# Altium PCB PROC106B_ASCII.PcbDoc (part 4 of 8)
Units mil, origin at the board's own origin, x right, y up, seen from the top; angles counter-clockwise.
Board outline 4498.18 x 1060.53 mil, 8 copper layers (Top Layer, GND1, Sig1, PWR1, PWR2, Sig2, GND2, Bottom Layer), stack 69.602 mil thick; 439 components, 327 nets, 1548 pads, 843 vias.
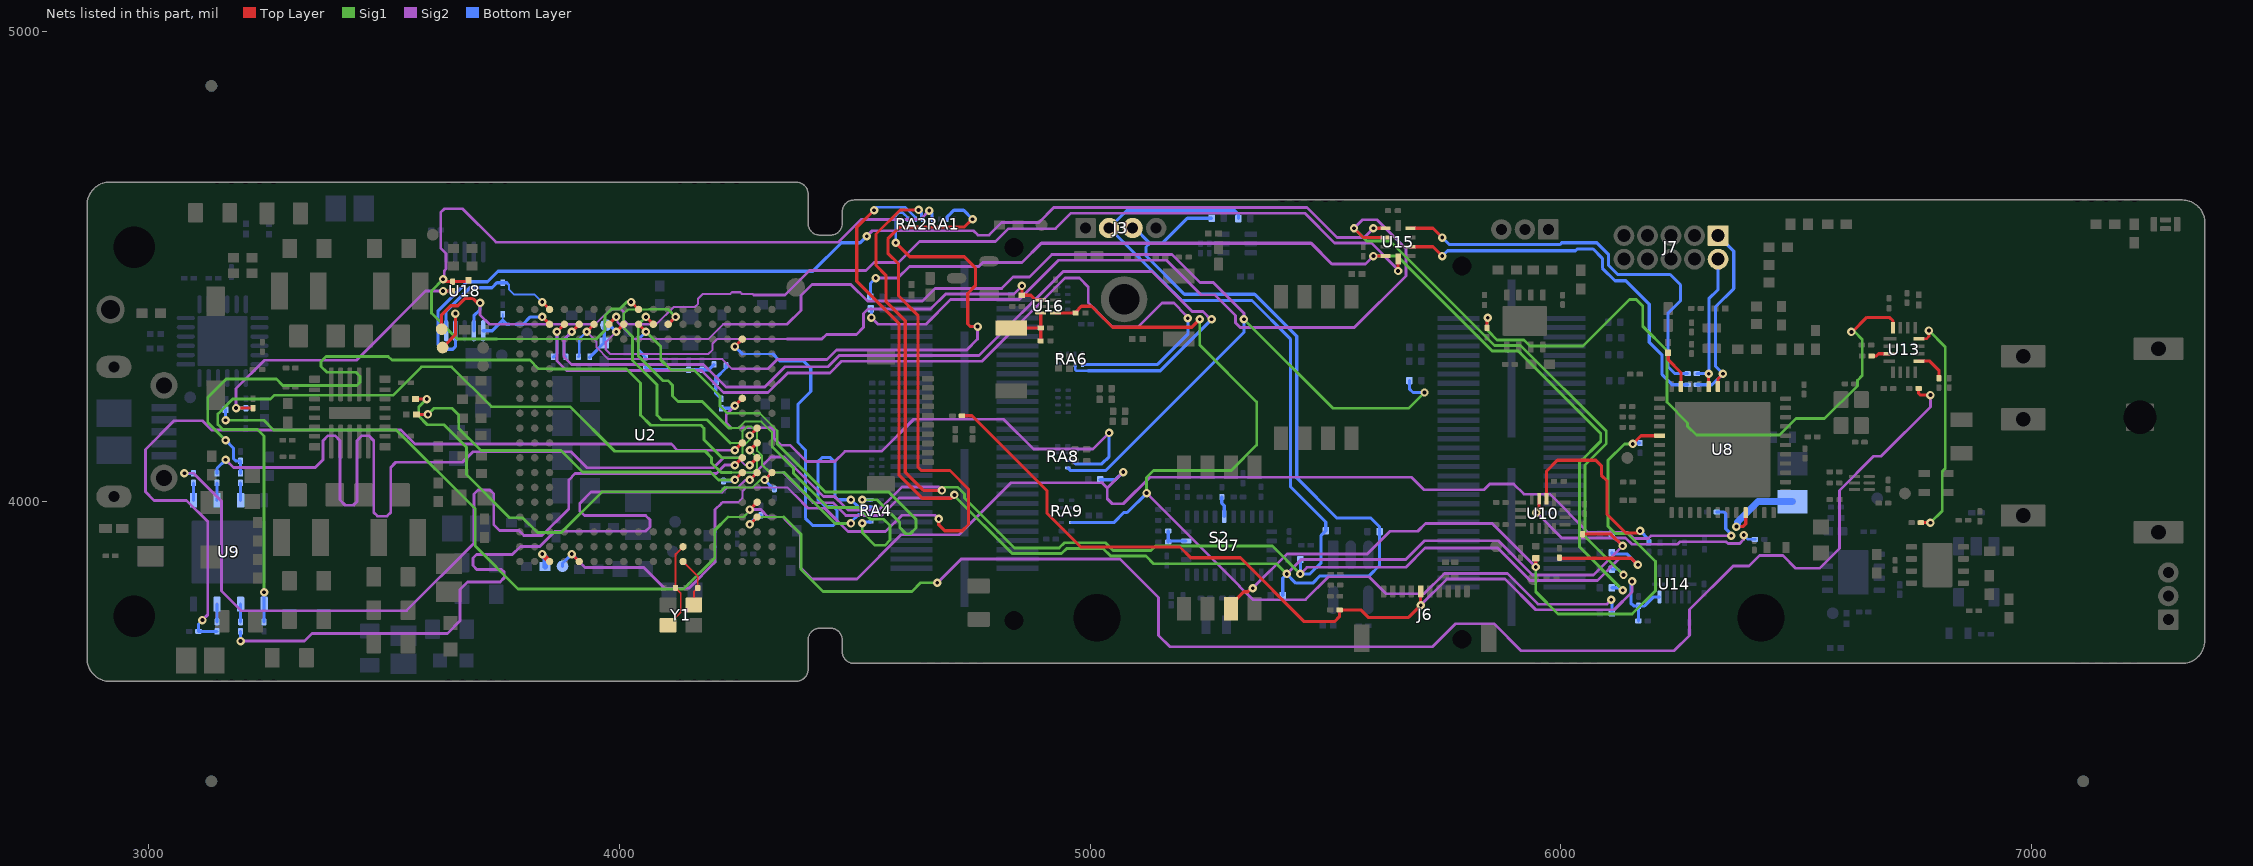
[diagram p10: the nets of this part, all layers, seen from the top]

## Via types
v1: diameter 18, hole 8, Top Layer to Bottom Layer, tented both sides, 804 vias
v2: diameter 19.68, hole 7.87, Top Layer to Bottom Layer, tented both sides, 34 vias
v3: diameter 20, hole 10, Top Layer to Bottom Layer, tented both sides, 3 vias
v4: diameter 18, hole 8, Top Layer to Bottom Layer, 1 vias
v5: diameter 17, hole 7.87, Top Layer to Bottom Layer, 1 vias

## Nets (pads, with @x,y where several pads share a name; then routed paths per layer and width w, separated by ;. In a path a pad name is that pad's centre, name@x,y a point inside that pad or via, vN(x,y) a via of type N, cw(c..) or ccw(c..) an arc to the next point about the centre after c; other vN are vias at no path point) (continued)
AR_MSS_LOGGER: R58.1 R61.1 R131.1 U2.E2 | length 4027.5
  Top Layer w6.7: v1(4276.95,3983.65) U2.E2@4292.7,3999.4
  Sig1 w4.5: 4230.89,3967.9 4263.85,3967.9 v1@4276.95,3981.01
  Sig1 w5.95: v1(3163.55,4173.41) 3244.94,4173.41 3265.5,4152.85 3526.01,4152.85 3694.1,3984.76 3694.1,3905.76 3784.97,3814.9 4136.48,3814.9 4202.76,3881.17 4202.76,3939.76 4230.89,3967.9 ; v1@4276.95,3981.01 v1(4276.95,3983.65)
  Sig2 w4.5: 4332.4,3967.9 4347.49,3967.9 4351.37,3964.02
  Sig2 w5.95: v1(4276.95,3983.65) 4300.25,3983.65 4316,3967.9 4332.4,3967.9 ; 4351.37,3964.02 4384.8,3930.59 4384.8,3860.7 4409.3,3836.2 4504.48,3836.2 4598.64,3930.36 4721.32,3930.36 4831.75,4040.79 5024.98,4040.79 5036.27,4029.5 ; v1(5070.29,4063.51) 5036.27,4029.5 ; v1(6361.81,3928) 6191.21,3928 6185.35,3922.14 6155.37,3922.14 6142.32,3935.19 6057.76,3935.19 5976.45,4016.5 5921.24,4016.5 5899.64,4038.09 5848.9,4038.09 5836.7,4025.89 5709.49,4025.89 5682.87,4052.51 5126.86,4052.51 5070.48,3996.13 5046.92,3996.13 5036.27,4006.77 5036.27,4029.5
  Bottom Layer w6.7: v1(3163.55,4173.41) R61.1@3163.55,4195.73 ; R131.1@6331.18,3978.41 6346.63,3978.41 6350.14,3974.9 6350.14,3942.93 6361.81,3931.25 v1(6361.81,3928)
  Bottom Layer w7: R58.1@5021.79,4046.94 5053.71,4046.94 v1(5070.29,4063.51)
AR_NERR_OUT: R21.1 RA6.5 U2.U15 | length 1993.9
  Top Layer w6.7: v1(3867.5,4361.6) U2.U15@3883.25,4377.35
  Sig2 w5.95: v1(3867.5,4361.6) 3867.5,4299.23 3887.45,4279.28 4174.81,4279.28 4221.6,4232.49 4315.95,4232.49 4357.63,4274.16 4447.2,4274.16 4471.92,4298.87 4770.04,4298.87 4946.76,4475.6 4977.21,4475.6 4995.86,4456.94 4995.86,4423.5 5012.97,4406.38 5012.97,4405.96 5047.64,4371.29 5101.75,4371.29 5152.98,4422.52 5177.86,4422.52 5202.97,4397.42 5202.97,4394.51 v1(5207.55,4389.93)
  Bottom Layer w5.95: R21.1@3859.46,4307.45 3867.5,4315.49 v1(3867.5,4361.6)
  Bottom Layer w6.7: RA6.5@4983.83,4292.08 5143.25,4292.08 5207.55,4356.38 v1(5207.55,4389.93)
AR_NERRIN: R22.1 RA6.6 U2.U14 | length 2037.8
  Top Layer w6.7: v1(3899,4361.6) U2.U14@3914.75,4377.35
  Sig2 w5.95: v1(3899,4361.6) 3882.53,4345.13 3882.53,4307.96 3898.41,4292.07 4178.83,4292.07 4226.53,4244.38 4308.8,4244.38 4351.48,4287.06 4443.29,4287.06 4466.99,4310.77 4763.99,4310.77 4942.88,4489.66 5131.64,4489.66 5216.95,4404.35 5239.74,4404.35 5256.22,4387.88 v1(5258,4387.88)
  Bottom Layer w5: RA6.6@4968.09,4292.08 4968.09,4281.08 4970.49,4278.67 4995.62,4278.67
  Bottom Layer w5.95: R22.1@3886.6,4307.94 R22.1@3886.73,4307.81
  Bottom Layer w6.7: R22.1@3886.73,4308.06 3882.45,4312.34 3882.45,4345.05 v1(3899,4361.6) ; 4995.62,4278.67 5148.79,4278.67 v1(5258,4387.88)
AR_NRST: C130.2 R59.1 R108.1 TP14.1 U2.U11 U16.4 | length 1215.9
  Top Layer w6.7: v1(3993.49,4361.6) U2.U11@4009.24,4377.35 ; v1(4855.01,4458.72) R108.1@4855.01,4439.06 4873.81,4439.06 4883.54,4429.33 U16.4@4894.79,4429.33
  Sig2 w4.5: v1(3993.49,4361.6) 3971.08,4339.19 3971.08,4323.63 3980.36,4314.36 4188.99,4314.36 4198.21,4323.58 4198.21,4336.63 4207.44,4345.85 4210.57,4345.85 4355.81,4345.85
  Sig2 w5.95: 4355.81,4345.85 4429.85,4345.85 4439.71,4355.71 4503.49,4355.71 4518.87,4371.09 4518.87,4400.52 4527.91,4409.56 4661.14,4409.56 4693.34,4441.76 4838.05,4441.76 v1(4855.01,4458.72)
  Bottom Layer w6.7: R59.1@3936.98,4307.45 3967.27,4337.73 C130.2@3967.83,4337.73 3967.83,4371.87 TP14.1@3971.52,4375.57 3979.52,4375.57 v1(3993.49,4361.6)
AR_NRST_1: R177.2 R190.2 RA9.8 U16.1 | length 2330.8
  Top Layer w6.7: U16.1@4926.29,4401.5 R177.2@4969.1,4401.5 4969.1,4403.14 4981.52,4415.55 5002.84,4415.55 5047.49,4370.91 5215.8,4370.91 5232.92,4388.03 v1(5232.92,4387.88)
  Sig1 w5.95: v1(5119.9,4018.83) 5119.9,4051.66 5134.96,4066.71 5299.7,4066.71 5353.73,4120.75 5353.73,4212.26 5232.92,4333.07 v1(5232.92,4387.88)
  Sig2 w5.95: v1(5119.9,4018.83) 5307.53,3831.21 5307.83,3831.21 5317.48,3821.56 5317.48,3820.44 5345.54,3792.38 5457.74,3792.38 5506.4,3841.04 5592.06,3841.04 5628.22,3804.88 5709.46,3804.88 5752.57,3847.99 5886.36,3847.99 5951.51,3782.84 6097.61,3782.84 v1(6107.15,3792.38)
  Bottom Layer w6.7: RA9.8@4960.68,3956.14 5050.1,3956.14 5071.56,3977.6 5078.67,3977.6 v1(5119.9,4018.83) ; v1(6107.15,3792.38) 6108.34,3791.19 R190.2@6108.34,3764.53
AR_NRST_2: C120.1 R124.1 SW2.1 U16.6 | length 121.5
  Top Layer w6.7: SW2.1@4832.84,4369.7 C120.1@4895.16,4369.7 ; R124.1@4894.79,4342.12 4895.16,4342.49 C120.1@4895.16,4369.7 ; U16.6@4895.16,4401.13 C120.1@4895.16,4369.7
AR_OSC_CLKOUT: RA1.3 TP17.1 U2.A14 | length 2160
  Top Layer w6.7: v1(3899,3889.16) U2.A14@3914.75,3873.41 ; v1(4678.32,3963.9) 4678.32,3951.47 4691.07,3938.71 4728.27,3938.71 4741.71,3952.15 4741.71,4027.32 4702.22,4066.81 4641.35,4066.81 4634,4074.16 4634,4396.53 4592.89,4437.64 4592.89,4505.8 4570.34,4528.35 4570.34,4558.71 4570.48,4558.71 4595.75,4583.98 4732.62,4583.98 4749.22,4600.58 v1(4750.21,4600.58)
  Sig2 w4.5: 4216.61,3996.99 4219.01,3999.4 4252.38,3999.4 4260.74,4007.75 4260.74,4008.15 4261.2,4008.62 4261.2,4022.2 4269.9,4030.89 4356.68,4030.89 4374.22,4013.35
  Sig2 w5.95: v1(3899,3889.16) 3927.14,3861.02 4051.83,3861.02 4096.42,3816.43 4147.32,3816.43 4203.16,3872.28 4203.16,3983.55 4216.61,3996.99 ; 4374.22,4013.35 4401.08,3986.49 4436.31,3986.49 4485.8,3937 4565.31,3937 4600.06,3971.75 4670.46,3971.75 v1(4678.32,3963.9)
  Bottom Layer w6.7: TP17.1@3879.25,3863.39 3879.25,3869.41 v1(3899,3889.16) ; RA1.3@4695.96,4600.58 RA1.3@4695.96,4604.84 ; 4699.83,4609.28 4695.96,4605.41 RA1.3@4695.96,4604.84 ; v1(4750.21,4600.58) 4731.24,4619.54 4710.67,4619.54 RA1.3@4695.96,4604.84
AR_PMIC_CLKOUT_SOP2: R85.1 R103.1 RA1.1 U2.V10 | length 1923.4
  Top Layer w6.7: v1@3627.89,4468 R85.1@3645.85,4468 3676.79,4468 R103.1@3679.35,4470.56 ; v1(4024.98,4424.59) U2.V10@4040.73,4408.84
  Sig1 w4.5: 3740,4346 3740.15,4345.85 3950.85,4345.85
  Sig1 w5.95: v1(3625.63,4473) 3600.7,4448.07 3600.7,4400.98 3655.67,4346 3740,4346 ; 3950.85,4345.85 3969.75,4364.75 3969.75,4395.82 3983.5,4409.57 4000.77,4409.57 4015.79,4424.59 v1(4024.98,4424.59)
  Sig2 w5.95: v1(3625.63,4473) 3627.94,4475.31 3627.94,4490.7 3631.71,4494.48 3631.71,4527.96 3620.45,4539.22 3620.45,4614.92 3628.33,4622.8 3666.82,4622.8 3737.83,4551.8 4465.19,4551.8 4513.33,4599.94 4639.35,4599.94 v1(4658.32,4618.91)
  Bottom Layer w6.7: v1(4658.32,4618.91) 4664.47,4612.77 RA1.1@4664.47,4600.58
AR_QSPI_CLK: R47.1 U2.H2 | length 1804.7
  Top Layer w6.7: v1(4276.95,4078.14) U2.H2@4292.7,4093.88
  Sig2 w4.5: 4221.56,4093.88 4251.98,4093.88 4267.73,4078.14 4274.39,4078.14 v1(4276.95,4078.14)
  Sig2 w5.95: v1(3163.55,4089.57) 3180.08,4073.05 3354.04,4073.05 3370.54,4089.54 3370.54,4129.94 3381.32,4140.73 3395.7,4140.73 3406.48,4129.94 3406.48,4004.24 3417.86,3992.86 3434.79,3992.86 3442.43,4000.51 3442.43,4129.94 3453.21,4140.73 3467.59,4140.73 3478.38,4129.94 3478.38,3977.88 3486.54,3969.72 3506.26,3969.72 3514.32,3977.78 3514.32,4034.94 3514.32,4073.37 3525.11,4084.16 3527.46,4084.16 3667.04,4084.16 3689.38,4106.5 3897.64,4106.5 3931.46,4072.68 4200.36,4072.68 4221.56,4093.88
  Bottom Layer w6.7: R47.1@3145.35,4060.46 3145.35,4071.36 v1(3163.55,4089.57)
AR_QSPI_CLK_T: R47.2 U9.6 | length 36.9
  Bottom Layer w6.7: U9.6@3145.35,4003.53 R47.2@3145.35,4040.44
AR_QSPI_CS: R43.1 U2.J2 U9.1 | length 1881.9
  Top Layer w6.7: v1(4276.95,4109.63) U2.J2@4292.7,4125.38
  Sig1 w4.5: 4238.93,4062.39 4283.48,4062.39 4292.7,4071.61 4292.7,4093.88 v1(4276.95,4109.63)
  Sig1 w5.95: v1(3245.35,3808.14) 3245.35,4139.83 3231.35,4153.82 3157.65,4153.82 3147.08,4164.39 3147.08,4186.72 3178.84,4218.48 3258.83,4218.48 3266.76,4226.42 3519.43,4226.42 3579.96,4286.95 3643.5,4286.95 3728.11,4202.33 3895.54,4202.33 3990.27,4107.6 4182.33,4107.6 4195.99,4093.95 4195.99,4082.82 4216.42,4062.39 4237.91,4062.39
  Bottom Layer w6.7: R43.1@3245.35,3744.96 U9.1@3245.35,3783.06 v1(3245.35,3808.14)
AR_QSPI_D0: R6.1 U2.H3 | length 1795.5
  Top Layer w6.7: v1(4245.46,4078.14) U2.H3@4261.2,4093.88
  Sig2 w5.95: v1(3076.13,4060.86) 3095.35,4060.86 3154.78,4001.42 3154.78,3810.48 3196.23,3769.03 3547.84,3769.03 3690.96,3912.15 3690.96,4016.64 3699.5,4025.18 3724.8,4025.18 3733.33,4016.64 3733.33,3951.37 3745.22,3939.48 3786.2,3939.48 3797.13,3928.55 3835.71,3928.55 3892.65,3985.5 3892.65,4046.96 3906.11,4060.42 4206.16,4060.42 4223.87,4078.14 v1(4245.46,4078.14)
  Bottom Layer w6.7: v1(3076.13,4060.86) 3074.85,4062.14 3072.51,4062.14 3074.19,4060.46 R6.1@3095.35,4060.46
AR_QSPI_D0_T: R6.2 U9.5 | length 36.9
  Bottom Layer w6.7: U9.5@3095.35,4003.53 R6.2@3095.35,4040.44
AR_QSPI_D1: R46.1 U2.G2 | length 1770.6
  Top Layer w6.7: v1(4276.95,4046.64) U2.G2@4292.7,4062.39
  Sig2 w4.5: 4228.47,4030.89 4252.08,4030.89 4267.82,4046.64 v1(4276.95,4046.64)
  Sig2 w5.95: v1(3195.35,3704.34) 3330.9,3704.34 3347.26,3720.71 3634.84,3720.71 3661.8,3747.66 3661.8,3814.17 3677.81,3830.18 3746.85,3830.18 3755.52,3838.86 3755.52,3850.5 3749.36,3856.66 3697.09,3856.66 3688.87,3864.88 3688.87,3880.63 3696.63,3888.39 3772.51,3888.39 3789.75,3905.63 3831,3905.63 3863.19,3937.82 4055.69,3937.82 4064.89,3947.02 4064.89,3962.06 4055.92,3971.03 3925.98,3971.03 3915.91,3981.09 3915.91,3996.84 3939.89,4020.82 4218.4,4020.82 4228.47,4030.89
  Bottom Layer w6.7: v1(3195.35,3704.34) R46.1@3195.35,3724.94
AR_QSPI_D1_T: R46.2 U9.2 | length 38.1
  Bottom Layer w6.7: R46.2@3195.35,3744.96 U9.2@3195.35,3783.06
AR_QSPI_D2: R44.1 R48.1 U2.J3 | length 1854.7
  Top Layer w6.7: v1(4245.46,4109.63) U2.J3@4261.2,4125.38
  Sig2 w5.95: v1(3114.34,3749.02) 3125.67,3760.34 3125.67,3958.3 3080.63,4003.33 3011.82,4003.33 2993.41,4021.75 2993.41,4111.63 3054.09,4172.31 3114.23,4172.31 3133.92,4152.62 3536,4152.62 3565.74,4122.88 4110.46,4122.88 4123.7,4109.63 v1(4245.46,4109.63)
  Bottom Layer w6.7: v1(3114.34,3749.02) 3105.99,3740.67 R44.1@3105.99,3724.94 R48.1@3145.35,3724.94
AR_QSPI_D2_T: R48.2 U9.3 | length 38.1
  Bottom Layer w6.7: R48.2@3145.35,3744.96 U9.3@3145.35,3783.06
AR_QSPI_D3: R45.1 R49.1 U2.K2 | length 1774.5
  Top Layer w6.7: v1(4276.95,4141.13) U2.K2@4292.7,4156.88
  Sig1 w4.5: 3828.67,4282.86 3853.37,4282.86 3853.69,4282.54 ; 4236.76,4093.88 4256.22,4093.88 4261.2,4098.87 4261.2,4116.15 4276.95,4131.9 v1(4276.95,4141.13)
  Sig1 w5.95: v1(3163.55,4131.09) 3125.67,4168.98 3125.67,4221.51 3165.01,4260.85 3271.81,4260.85 3285.09,4247.57 3442.38,4247.57 3449.08,4254.28 3449.08,4266.8 3440.5,4275.38 3378.6,4275.38 3366.31,4287.67 3366.31,4298.33 3377.21,4309.23 3508.92,4309.23 3516.76,4301.39 3810.14,4301.39 3810.14,4301.18 3828.57,4282.75 ; 3853.69,4282.54 4014.79,4282.54 4044.76,4252.57 4044.76,4185.79 4045.01,4185.54 4045.01,4184.3 4066.55,4162.76 4173.6,4162.76 4179.99,4156.37 4179.99,4131.98 4218.09,4093.88 4236.76,4093.88
  Bottom Layer w6.7: v1(3163.55,4131.09) 3180.3,4114.35 3180.3,4091.8 3185,4087.09 R45.1@3195.34,4087.09 R49.1@3195.35,4060.46
AR_QSPI_D3_T: R49.2 U9.7 | length 36.9
  Bottom Layer w6.7: U9.7@3195.35,4003.53 R49.2@3195.35,4040.44
AR_RS232RX: R5.2 U2.V16 U18.10 | length 328.8
  Top Layer w6.7: v1(3836.01,4424.59) U2.V16@3851.76,4408.84
  Bottom Layer w4: R5.2@3751.45,4463.67 3762.24,4463.67 3765.83,4460.07 3765.83,4450.94 3775.9,4440.87 3819.73,4440.87 v1(3836.01,4424.59)
  Bottom Layer w6.7: U18.10@3631.98,4363.67 3631.98,4405.07 3681.99,4455.07 3729.37,4455.07 3739.76,4465.47 R5.2@3752.34,4465.47 3760.9,4465.47 3764.48,4461.89
AR_RS232RX_BT: R102.1 U15.4 | length 872.1
  Top Layer w6.7: U15.4@5680.77,4581.32 5728.21,4581.32 v1(5747.9,4561.63)
  Bottom Layer w6.7: v1(5747.9,4561.63) 5762.65,4546.88 5998.24,4546.88 6001.92,4550.56 6076.19,4550.56 6101.44,4525.3 6101.44,4502.14 6120.42,4483.16 6231.98,4483.16 6254.08,4461.06 6254.08,4427.28 6227.56,4400.75 6227.56,4287.33 6242.43,4272.45 R102.1@6268.98,4272.45
AR_RS232TX: R4.2 U2.U16 U18.6 | length 179.6
  Top Layer w6.7: v1(3836.01,4393.1) U2.U16@3851.76,4377.35
  Bottom Layer w4: 3752.37,4386.08 R4.2@3752.37,4398.83 ; 3765.74,4377.35 3780.29,4377.35
  Bottom Layer w6.7: U18.6@3710.72,4363.67 3729.97,4363.67 3752.37,4386.08 3761.1,4377.35 3765.74,4377.35 ; 3780.29,4377.35 3780.48,4377.54 ; 3780.67,4377.35 3795.28,4377.35 3811.02,4393.1 v1(3836.01,4393.1)
AR_RS232TX_BT: R90.1 U15.2 | length 805.8
  Top Layer w6.7: U15.2@5680.77,4541.95 5728.21,4541.95 v1(5747.9,4522.26)
  Bottom Layer w6.7: v1(5747.9,4522.26) 5759.11,4533.48 6030.91,4533.48 6034.59,4537.16 6068.31,4537.16 6088.04,4517.43 6088.04,4496.59 6114.87,4469.76 6138.04,4469.76 6187.61,4420.19 6187.61,4338.81 6215.01,4311.41 6215.01,4270.47 6236.48,4249 R90.1@6268.98,4249
AR_SCL: J3.2 R8.1 R32.1 R51.1 R67.1 R70.2 R99.2 R187.2 RA2.4 U2.G3 | length 5376.7
  Top Layer w6.7: R32.1@3569.24,4185.79 v1(3593.3,4185.79) ; v1(4245.46,4046.64) U2.G3@4261.2,4062.39 ; v1(4635.47,4620.16) 4596.3,4620.16 4545.25,4569.1 4545.25,4502.72 4566.09,4481.87 4566.09,4426.01 4607.2,4384.9 4607.2,4063.06 4645.74,4024.52 v1(4685.21,4024.52) ; R99.2@5996.83,3881.68 5996.83,3880.21 6149.81,3880.21 v1(6163.54,3866.48)
  Sig1 w5.95: v1(3593.3,4185.79) 3606.52,4199 3644.38,4199 3658.97,4184.42 3658.97,4156.03 3706,4109 3876,4109 3921.47,4063.53 4193.8,4063.53 4210.69,4046.64 v1(4245.46,4046.64) ; v1(4685.21,4024.52) 4692.07,4031.37 4718.53,4031.37 4733.17,4016.73 4733.17,4008.22 4839.36,3902.03 4934.23,3902.03 4945.47,3913.27 5032.3,3913.27 5048.61,3896.95 5129.55,3896.95 5138.86,3906.27 5387.15,3906.27 v1(5446.44,3846.98)
  Sig2 w4.5: v1(4245.46,4046.64) 4261.2,4062.39 4284.5,4062.39
  Sig2 w5.95: 4284.5,4062.39 4289.36,4062.39 4322.44,4095.46 4349.94,4095.46 4433.87,4011.54 4457.3,4011.54 4486,3982.83 4551.88,3982.83 4600.46,4031.41 4678.31,4031.41 v1(4685.21,4024.52) ; v1(5446.44,3846.98) 5460.56,3861.09 5670.52,3861.09 5711.63,3902.2 5865.8,3902.2 5934.83,3833.17 6077.4,3833.17 6123.79,3879.56 6149.05,3879.56 6162.13,3866.48 v1(6163.54,3866.48)
  Bottom Layer w6.7: R8.1@4221.23,4044.42 4243.24,4044.42 v1(4245.46,4046.64) ; v1(4635.47,4620.16) 4641.72,4613.9 4641.72,4603.34 RA2.4@4644.48,4600.58 ; R51.1@5314.8,4601.84 5314.8,4611.25 5307.13,4618.93 5077.46,4618.93 J3.2@5040.29,4581.75 5194.28,4427.76 5343.89,4427.76 5425.37,4346.28 5425.37,4032.66 5500.54,3957.49 R67.1@5500.54,3938.91 5490.54,3928.91 5490.54,3870.63 5466.89,3846.98 v1@5446.8,3846.98 ; v1(5446.44,3846.98) v1@5446.8,3846.98 ; R70.2@5446.8,3877.69 v1@5446.8,3846.98 ; R187.2@6108.34,3892.26 6108.34,3889.24 6140.78,3889.24 v1(6163.54,3866.48)
AR_SDA: J3.3 R7.1 R28.1 R57.1 R68.1 R71.2 R101.2 R186.2 RA2.3 U2.G1 | length 5570.2
  Top Layer w6.7: R28.1@3566.89,4218.48 v1(3590.95,4218.48) ; v1(4308.45,4046.64) U2.G1@4324.2,4062.39 ; v1(4541.01,4619.79) 4504.36,4583.14 4504.36,4468.8 4593.8,4379.35 4593.8,4057.51 4643.39,4007.92 4704.73,4007.92 v1(4711.71,4014.9) ; R101.2@6046.19,3931.55 6106.05,3931.55 v1(6131.02,3906.59)
  Sig1 w4.5: 4223.95,4030.89 4283.48,4030.89 4299.22,4046.64 v1(4308.45,4046.64)
  Sig1 w5.95: v1(3590.95,4218.48) 3573.79,4201.33 3573.79,4182.21 3592,4164 3627.18,4164 3675,4116.18 3675,4058 3766.5,3966.5 3794.5,3966.5 3826,3935 3876.7,3935 3963.12,4021.42 4214.48,4021.42 4223.95,4030.89 ; v1(4711.71,4014.9) 4711.71,4012.86 4834.43,3890.14 4939.16,3890.14 4950.39,3901.38 5027.37,3901.38 5043.69,3885.06 5118.56,3885.06 5134.9,3868.71 5395.87,3868.71 v1(5417.61,3846.98)
  Sig2 w4.5: v1(4308.45,4046.64) 4324.2,4062.39 4347.49,4062.39
  Sig2 w5.95: 4347.49,4062.39 4411.45,3998.42 4453.59,3998.42 4481.08,3970.94 4556.8,3970.94 4593.91,4008.04 4704.85,4008.04 v1(4711.71,4014.9) ; v1(5417.61,3846.98) 5448.43,3877.79 5670.4,3877.79 5710.25,3917.64 5867.17,3917.64 5939.75,3845.06 6069.49,3845.06 v1(6131.02,3906.59)
  Bottom Layer w5: v1(4541.01,4619.79) 4546.89,4625.68 4607.49,4625.68 4628.74,4604.43 RA2.3@4628.74,4600.58
  Bottom Layer w6.7: v1(4308.45,4046.64) 4327.65,4027.44 R7.1@4329.25,4027.44 ; J3.3@5090.29,4581.75 5095.03,4581.75 5127.03,4549.75 ; R57.1@5258,4602.69 5206.48,4602.69 5153.54,4549.75 5127.03,4549.75 ; R71.2@5409.05,3801.26 5409.05,3838.42 v1(5417.61,3846.98) 5436.94,3827.64 5472.95,3827.64 5488.3,3842.99 5592.79,3842.99 5614.67,3864.87 R68.1@5614.67,3937.06 5614.67,3947.67 5596.41,3965.94 5523.8,3965.94 5438.77,4050.97 5438.77,4351.83 5349.44,4441.16 5200.24,4441.16 5118.68,4522.72 5118.68,4541.4 5127.03,4549.75 ; R186.2@6108.34,3931.22 6108.34,3929.27 v1(6131.02,3906.59)
AR_SOP0: R83.2 R158.2 R159.1 R174.2 | length 153.2
  Bottom Layer w6.7: R83.2@4055.26,4286.87 4061.4,4280.73 R174.2@4147.23,4280.73 R158.2@4175.56,4280.73 4189.83,4280.73 R159.1@4201.23,4292.13
AR_SOP1: R84.2 R170.2 R171.1 | length 85.3
  Bottom Layer w6.7: R84.2@4216.3,4218.86 4204.73,4230.43 R170.2@4204.73,4253.13 4204.73,4262.79 4226.45,4284.51 R171.1@4226.45,4290.4
AR_SOP2: R85.2 R172.2 R176.2 | length 643.8
  Top Layer w6.7: v1(3185.9,4199.43) R176.2@3221.71,4199.43 ; v1(3625.63,4447.98) R85.2@3645.85,4447.98
  Sig2 w5.95: v1(3185.9,4199.43) 3185.9,4240.85 3246.04,4301 3441.34,4301 3588.32,4447.98 v1(3625.63,4447.98)
  Bottom Layer w6.7: v1(3185.9,4199.43) R172.2@3206.71,4199.43
AR_SPICLK1: R75.2 R136.2 U2.D2 | length 3279.1
  Top Layer w6.7: v1(4276.95,3952.15) U2.D2@4292.7,3967.9 ; R136.2@6759.84,4241 6759.84,4230.98 6763.81,4227 v1(6784.81,4227)
  Sig1 w4.5: v1(4276.95,3952.15) 4292.7,3967.9 4349.27,3967.9 4349.34,3967.83
  Sig1 w5.95: 4349.34,3967.83 4385.89,3931.28 4385.89,3856.5 4432.49,3809.9 4621.29,3809.9 4639.82,3828.43 v1(4675.5,3828.43)
  Sig2 w5.95: v1(4675.5,3828.43) 4726.11,3879.04 5063.11,3879.04 5145.43,3796.73 5145.43,3716.52 5169.69,3692.25 5727.49,3692.25 5776.66,3741.42 5857.96,3741.42 5915.5,3683.88 6240.37,3683.88 6273.14,3716.64 6273.14,3771.13 6365.96,3863.95 6399.47,3863.95 6421.81,3886.29 6471.49,3886.29 6498.84,3858.94 6549.45,3858.94 6591.81,3901.3 6591.81,4024.46 6664.35,4097 6679.86,4097 6784.81,4201.95 v1(6784.81,4227)
  Bottom Layer w5: v1@4276.95,3954.07 v1@4278.87,3954.07
  Bottom Layer w6.7: v1@4276.95,3954.07 4289.54,3966.66 4295.76,3966.66 R75.2@4300.76,3971.66
AR_SYNC_IN: R157.1 RA8.8 U2.U12 | length 2620.6
  Top Layer w6.7: U2.U12@3977.74,4377.35 v1(3993.49,4393.1)
  Sig1 w5.95: v1(5326.65,4387.88) 5515.35,4199.18 5676.96,4199.18 v1(5710.24,4232.45)
  Sig2 w4.5: v1(3993.49,4393.1) 3996.07,4390.51 3996.07,4381.95 4032.17,4345.85 4063,4345.85 4112.95,4345.85 4188.99,4345.85 4220.48,4377.35 4356.34,4377.35
  Sig2 w5.95: 4356.34,4377.35 4385.89,4406.89 4385.89,4438.68 4409.3,4462.1 4491.39,4462.1 4526.87,4426.61 4643.58,4426.61 4670.63,4453.66 4812.05,4453.66 4836.34,4477.95 4871.22,4477.95 4918.61,4525.34 5174.08,4525.34 5233.52,4465.91 5261.55,4465.91 5326.65,4400.81 v1(5326.65,4387.88)
  Bottom Layer w6.7: RA8.8@4952.69,4072.25 4957.85,4067.09 5033.79,4067.09 5326.65,4359.96 v1(5326.65,4387.88) ; R157.1@5678.13,4257.72 5678.13,4240.18 5685.85,4232.45 v1(5710.24,4232.45)
AR_SYNC_OUT_SOP1: R84.1 RA8.7 U2.M3 | length 1179
  Top Layer w6.7: v1(4245.46,4204.12) U2.M3@4261.2,4219.87
  Sig2 w4.5: 4235.73,4159.06 4237.91,4156.88 4253,4156.88
  Sig2 w5.95: 4235.73,4159.06 4227.18,4167.6 4227.18,4185.84 v1(4245.46,4204.12) ; 4253.73,4157.6 4322.82,4157.6 4329.06,4151.36 4329.06,4134.78 4343.24,4120.6 4362.86,4120.6 4397.76,4085.71 4457.46,4085.71 4479.23,4107.47 4557.18,4107.47 4625.34,4175.63 4816.08,4175.63 4879.55,4112.15 5005.9,4112.15 v1(5040.24,4146.48)
  Bottom Layer w6.7: R84.1@4216.3,4198.83 4240.17,4198.83 v1(4245.46,4204.12) ; RA8.7@4952.69,4088 4961.76,4088 4968.99,4080.76 5024.83,4080.76 5040.29,4096.22 5040.29,4135.89 5040.24,4135.94 v1(5040.24,4146.48)
AR_TCK: RA4.3 U2.T3 | length 974.4
  Top Layer w6.7: v1(4245.46,4330.1) U2.T3@4261.2,4345.85
  Bottom Layer w5: 4261.2,4314.36 4325.67,4314.36
  Bottom Layer w6.7: v1(4245.46,4330.1) 4261.2,4314.36 ; 4325.67,4314.36 4340.28,4299.75 4390.87,4299.75 4406.51,4284.11 4406.51,4234.46 4379.38,4207.33 4379.38,4126.23 4395.25,4110.36 4395.25,3965.55 4410.79,3950.01 4454.85,3950.01 4462.29,3957.46 4462.29,3981.86 4453.83,3990.33 4436.99,3990.33 4421.62,4005.71 4421.62,4085.22 4430.48,4094.08 4448.07,4094.08 4457.75,4084.4 4457.75,4011.34 4464.36,4004.73 v1(4491.92,4004.73) ; v1@4492.09,4004.91 4510.56,3986.44 4523.94,3986.44 4526.49,3988.99 RA4.3@4534.27,3988.99
AR_TDI: RA4.1 U2.U9 | length 989.4
  Top Layer w6.7: v1(4056.48,4393.1) U2.U9@4072.23,4377.35
  Sig1 w4.5: 4237.91,4156.88 4253.05,4156.88 4266.69,4170.51 4301.34,4170.51 4323.86,4147.99 ; 4324.2,4147.65 4324.2,4117.62 4324.92,4116.89
  Sig1 w5.95: v1(4056.48,4393.1) 4040.01,4376.62 4040.01,4309.82 4092.23,4257.6 4103.3,4257.6 4112.95,4247.95 4112.95,4224.77 4124.62,4213.1 4176.21,4213.1 4232.44,4156.88 4237.91,4156.88 ; 4324.92,4116.89 4370.19,4071.63 4370.19,4060.96 4442.99,3988.16 4508.96,3988.16 4534.07,3963.06 4561.59,3963.06 4575.01,3949.63 4575.01,3918.91 4563.91,3907.8 4543.12,3907.8 4516.02,3934.9 v1(4516.02,3954.47)
  Bottom Layer w6.7: v1(4516.02,3954.47) 4519.04,3957.49 RA4.1@4534.27,3957.49
AR_TDO_SOP0: R83.1 RA4.4 U2.U10 | length 1066.3
  Top Layer w6.7: U2.U10@4040.73,4377.35 v1(4056.48,4361.6)
  Sig1 w4.5: 4226.28,4191.13 4229.04,4188.37 4298.25,4188.37 4335.37,4151.25 4335.37,4123.27
  Sig1 w5.95: v1(4056.48,4361.6) 4087.98,4330.1 4087.98,4302.05 4109.96,4280.07 4158.63,4280.07 4213.96,4224.74 4213.96,4203.45 4226.28,4191.13 ; 4335.37,4123.27 4437.43,4021.21 4572.32,4021.21 4630.43,3963.1 4630.43,3944.98 4617.97,3932.52 4608.42,3932.52 4595.57,3945.37 4595.57,3956.09 4546.92,4004.73 v1(4516.02,4004.73)
  Bottom Layer w5.95: R83.1@4055.26,4306.9 4047.92,4314.24 4047.92,4315.79 4040.31,4323.4 4040.31,4345.43 v1(4056.48,4361.6)
  Bottom Layer w6.7: v1(4516.02,4004.73) RA4.4@4534.27,4004.74
AR_TMS: RA4.2 U2.U8 | length 1020.5
  Top Layer w6.7: U2.U8@4103.72,4377.35 v1(4119.47,4393.1)
  Sig1 w4.5: 4012.76,4366.34 4009.24,4369.87 4009.24,4399.62 4018.46,4408.84 4063.71,4408.84 ; 4235.58,4125.38 4255.66,4125.38 4261.2,4130.93 4261.2,4150.25 4271.01,4160.06 4280.29,4160.06 4292.7,4147.65 4292.7,4134.6 4292.7,4108.66 4303.15,4098.21 4303.15,4079.13 4319.89,4062.39 4350.27,4062.39
  Sig1 w5.5: 4063.71,4408.84 4103.72,4408.84
  Sig1 w5.95: 4012.76,4366.34 4028.11,4350.99 4028.11,4300.71 4080.01,4248.82 4080.01,4184.3 4089.66,4174.66 4186.31,4174.66 4235.58,4125.38 ; 4103.72,4408.84 v1(4119.47,4393.1) ; 4350.27,4062.39 4458.22,3954.44 v1(4491.92,3954.44)
  Bottom Layer w6.7: v1(4491.92,3954.44) 4491.92,3957.3 4507.67,3973.04 4529.49,3973.04 4529.69,3973.24 RA4.2@4534.27,3973.24
AR_VBGAP: C69.1 U2.A16 | length 51.5
  Top Layer w12: v1(3836.01,3889.16) U2.A16@3851.76,3873.41
  Bottom Layer w12: v1(3836.01,3889.16) 3842.44,3882.73 C69.1@3842.44,3862.61
AR_WARMRST: R23.1 RA2.2 U2.U13 | length 1439.2
  Top Layer w6.7: v1(3930.5,4361.6) U2.U13@3946.24,4377.35 ; v1(4586.89,4550.32) 4616.57,4520.65 4732.64,4520.65 4756.13,4497.15 4756.13,4458.87 4739.91,4442.64 4739.91,4377.98 4745.37,4372.52 v1(4761,4372.52)
  Sig2 w4.5: v1(3930.5,4361.6) 3951.62,4340.47 3951.62,4328.31 3976.69,4303.25 4218.55,4303.25 4238.93,4282.86 4314.97,4282.86
  Sig2 w5.95: 4315.78,4282.86 4335.38,4302.46 4440.95,4302.46 4461.15,4322.66 4737.94,4322.66 4761,4345.72 v1(4761,4372.52)
  Bottom Layer w5: R23.1@3913.05,4308.06 3914.7,4309.71 3914.7,4345.8 v1(3930.5,4361.6) ; v1(4586.89,4550.32) 4586.89,4607.62 4593.25,4613.98 4602.64,4613.98 4612.99,4603.63 RA2.2@4612.99,4600.58
AR_XTAL_N: C71.1 U2.B7 Y1.3 | length 189.4
  Top Layer w4: Y1.3@4103.21,3737.98 4130.48,3765.26 4130.48,3806.44 C71.1@4119.48,3817.45 4119.35,3817.58 4119.35,3889.03 U2.B7@4135.22,3904.91
AR_XTAL_P: C14.1 U2.A7 Y1.1 | length 112.5
  Top Layer w4: U2.A7@4135.22,3873.41 4166.48,3842.15 C14.1@4166.48,3817.27 4158.32,3809.11 Y1.1@4158.32,3777.29
BOOTN: R80.2 R96.1 U7.4 | length 61.7
  Bottom Layer w6.7: R96.1@5166,3938 R80.2@5166,3915 5168.06,3917.06 U7.4@5203.84,3917.06
BREAK_RS232RX: TP19.1 U15.6 U18.9 | length 2414.4
  Top Layer w6.7: TP19.1@3624.53,4327.96 3651.67,4355.1 v1(3651.67,4400.1) ; v1(5601.8,4581.32) U15.6@5627.62,4581.32
  Sig2 w5.95: v1(4525.62,4564.56) 4537.22,4576.15 4752.1,4576.15 4761.6,4566.65 4784.9,4566.65 4811.82,4593.56 4891.05,4593.56 4922.76,4625.27 5460.93,4625.27 5524.35,4561.85 5582.34,4561.85 v1(5601.8,4581.32)
  Bottom Layer w6.7: v1(3651.67,4400.1) U18.9@3651.67,4363.67 3651.67,4329.8 3646.2,4324.34 3625.03,4324.34 3614.44,4334.93 3614.44,4405.27 3676.79,4467.62 3719.88,4467.62 3742.11,4489.85 4411.03,4489.85 4471.76,4550.57 4511.53,4550.57 4525.51,4564.56 v1(4525.62,4564.56)
BREAK_RS232TX: TP18.1 U15.10 U18.7 | length 2404.6
  Top Layer w6.7: TP18.1@3622.56,4367.08 3622.56,4397.71 3641.55,4416.7 3656.78,4416.7 3672.52,4432.45 3688.23,4432.45 3701.04,4419.64 3704.07,4422.68 v1(3704.17,4422.68) ; v1(5654.19,4490.55) U15.10@5654.19,4516.36
  Sig2 w4.5: 3757.52,4377.35 3949.08,4377.35 3980.57,4408.84 4003.69,4408.84 4009.24,4403.3 4009.24,4386.57 4018.46,4377.35 4078.74,4377.35 4115.31,4413.92 4160.41,4413.92 4166.72,4420.23 4166.72,4431.11 4177.13,4441.52 4235.22,4441.52 4238.98,4445.28 4256.76,4445.28 4260.52,4441.52 4283.32,4441.52 4285.43,4439.41
  Sig2 w5.95: v1(3704.17,4422.68) 3704.17,4396.97 3723.79,4377.35 3757.52,4377.35 ; 4285.43,4439.41 4351.66,4439.41 4404.06,4491.81 4523.81,4491.81 4540.78,4508.77 4593.31,4508.77 4637.45,4552.91 4798.86,4552.91 4826.36,4580.42 4926.72,4580.42 4959.68,4613.38 5456.01,4613.38 5519.43,4549.96 5597.4,4549.96 5654.19,4493.17 v1(5654.19,4490.55)
  Bottom Layer w6.7: U18.7@3691.04,4363.67 3691.04,4395.72 3704.17,4408.85 v1(3704.17,4422.68)
"BT ENABLE": R30.1 R110.1 S2.3 U8.17 | length 1611.9
  Top Layer w6.7: S2.3@5299.37,3773.46 5299.37,3781.83 5326.65,3809.11 5335.01,3809.11 5342.67,3816.77 v1(5345.19,3816.77) ; v1(6152.53,4123.13) 6170.03,4140.64 U8.17@6209.52,4140.64
  Top Layer w7: v1(5946.67,3861.76) R30.1@5946.67,3880.72
  Sig1 w5.95: v1(5946.67,3861.76) 5946.67,3809.24 5993.83,3762.08 6151.35,3762.08 6200.62,3811.35 6200.62,3873.79 6141.21,3933.2 6115.53,3933.2 6100.29,3948.44 6100.29,4088.49 6134.93,4123.13 v1(6152.53,4123.13)
  Sig2 w5.95: v1(5345.19,3816.77) 5418.11,3889.69 5588.66,3889.69 5636.7,3937.73 5695.79,3937.73 5712.26,3954.2 5854.23,3954.2 v1(5946.67,3861.76)
  Bottom Layer w6.7: v1(6152.53,4123.13) 6154.66,4125.26 R110.1@6168.27,4125.26
BT_RST: R91.2 U10.3 | length 549.1
  Top Layer w6.7: v1(5947.91,3977.25) 5953.68,3983.02 U10.3@5953.68,4006.69 ; v1(6388.18,3929.64) v1@6391.36,3926.46
  Sig2 w5.95: v1(5947.91,3977.25) 6001.87,3923.29 6137.4,3923.29 6150.44,3910.25 6248.08,3910.25 6253.35,3915.52 6351,3915.52 6354.99,3911.53 6379.77,3911.53 6388.18,3919.94 v1(6388.18,3929.64)
  Bottom Layer w5.95: v1(6388.18,3929.64) 6397.29,3920.53 R91.2@6412.14,3920.53
BT_UART_RX: J7.1 R90.2 U8.7 | length 426
  Top Layer w6.7: U8.7@6333.54,4244.97 6333.58,4245 6333.58,4261.53 v1(6344.18,4272.14)
  Bottom Layer w5.5: J7.1@6333.84,4565.56 J7.1@6340.47,4558.92
  Bottom Layer w6.7: R90.2@6289,4249 6321.04,4249 v1(6344.18,4272.14) 6328.44,4287.88 6328.44,4414.44 6367,4453 6367,4532.4 J7.1@6340.47,4558.92
BT_UART_TX: J7.2 R102.2 U8.8 | length 303.9
  Top Layer w6.7: U8.8@6313.85,4244.97 v1(6313.85,4272.45)
  Bottom Layer w6.7: R102.2@6289,4272.45 v1(6313.85,4272.45) 6314.6,4273.2 6314.6,4431.5 6314.33,4431.77 6333.84,4451.28 J7.2@6333.84,4515.56
CAN1_FD_RX: R127.2 U13.3 | length 39.7
  Top Layer w6.7: R127.2@6659.81,4310 6669.93,4310 6674.81,4314.88 U13.3@6697.44,4314.88
CAN1_FD_TX: R123.2 U13.16 | length 1396.9
  Top Layer w5.5: v1@5843.14,4390.03 v1(5844.47,4391.36)
  Top Layer w6.7: R123.2@5843.14,4369.72 v1@5843.14,4390.03 ; v1(6617,4361) 6619,4361 6650,4392 6697.81,4392 6705.32,4384.5 U13.16@6705.32,4370
  Sig1 w5.95: v1(5844.47,4391.36) 5844.47,4364.44 5864.63,4344.28 5921.27,4344.28 5934.47,4331.08 6047.05,4331.08 6145.89,4429.93 6160.16,4429.93 6173.93,4416.16 6173.93,4399.44 6173.8,4399.32 6173.8,4373.16 6225.17,4321.8 6225.17,4211.88 6269.16,4167.89 6269.16,4160.84 6288.11,4141.89 6464.32,4141.89 6499.36,4176.94 6560.03,4176.94 6629.71,4246.61 6629.71,4258.29 6639.96,4268.53 6639.96,4345.36 6624.31,4361 v1(6617,4361)
CAN2_FD_RX: R120.2 U13.9 | length 67.4
  Top Layer w6.7: U13.9@6760.43,4299.13 6783.77,4299.13 6802.81,4280.09 R120.2@6802.81,4263
CAN2_FD_TX: R116.2 U13.12 | length 490.9
  Top Layer w5.5: U13.12@6760.43,4346.38 6776.09,4346.38 6781.81,4352.1 v1(6781.81,4364)
  Top Layer w6.7: R116.2@6764.81,3956 v1(6784.78,3956)
  Sig1 w5.95: v1(6781.81,4364) 6816.25,4329.56 6816.25,4071.26 6809.9,4064.92 6809.9,3981.12 v1(6784.78,3956)
CLKSEL0: R82.2 U7.10 | length 43.9
  Bottom Layer w6.7: R82.2@5279.72,4010.48 5279.72,3997.37 5285.04,3992.06 U7.10@5285.04,3968.74
CONN_AR_RS232RX: R14.2 R188.2 U15.7 | length 2708.7
  Top Layer w6.7: v1(5560.49,4581.32) 5580.17,4561.63 U15.7@5627.62,4561.63
  Sig1 w5.95: v1(5560.49,4581.32) 5587.65,4554.15 5637.36,4554.15 5859.12,4332.39 5914.31,4332.39 6096.46,4150.24 6096.46,4124 6051.11,4078.65 6051.11,3926.7 v1(6132.95,3844.86)
  Sig2 w5.95: v1(4535.35,4391.71) 4549.64,4377.41 4651.24,4377.41 4703.69,4429.87 4849.45,4429.87 4933.03,4513.45 5161.86,4513.45 5235.02,4440.28 5263.83,4440.28 5308.48,4395.63 5308.48,4381.06 5308.34,4380.92 5318.8,4370.45 5561.15,4370.45 5670.66,4479.97 5670.66,4537.85 5609.13,4599.39 5578.55,4599.39 v1(5560.49,4581.32)
  Bottom Layer w6.7: R14.2@4534.32,4410.25 4535.35,4409.22 v1(4535.35,4391.71) ; R188.2@6108.34,3857.41 6120.4,3857.41 v1(6132.95,3844.86)
CONN_AR_RS232TX: R12.2 R189.2 U15.9 | length 2238.4
  Top Layer w6.7: v1(5601.8,4522.26) U15.9@5627.62,4522.26
  Sig1 w5.95: v1(5601.8,4522.26) 5652.42,4522.26 5854.19,4320.49 5909.38,4320.49 6084.56,4145.31 6084.56,4128.92 6039.22,4083.58 6039.22,3904.68 v1(6131.43,3812.47)
  Sig2 w6.7: v1(4544.64,4475.55) 4591.67,4475.55 4616.2,4500.09 4763.38,4500.09 4771.85,4508.55 4855.38,4508.55 4896.34,4549.51 5469.51,4549.51 5513.6,4505.42 5584.95,4505.42 v1(5601.8,4522.26)
  Bottom Layer w6.7: R12.2@4533.36,4434.59 4533.36,4464.27 v1(4544.64,4475.55) ; R189.2@6108.34,3817.56 6126.34,3817.56 v1(6131.43,3812.47)
DCDC_SW: L7.1 U8.33 | length 190.7
  Top Layer w6.7: v1(6372.8,3947.63) 6386.54,3947.63 6392.59,3953.68 U8.33@6392.59,3977.25
  Bottom Layer w15: v1@6374.8,3947.63 6374.8,3957.22 6418.41,4000.83 L7.1@6491.96,4000.83
DIO6_GLED: R17.1 U8.11 | length 82.8
  Top Layer w6.7: R17.1@6227.85,4316.62 6227.85,4301.96 6254.8,4275.01 U8.11@6254.8,4244.97
DISP: R168.2 U10.2 | length 417.7
  Top Layer w6.7: U10.2@5969.43,4006.69 5969.43,4065.41 5992.45,4088.43 6074.39,4088.43 6086.01,4076.82 6086.01,4057.02 6098,4045.03 6098,3973.98 6137.85,3934.13 6163.85,3934.13 v1(6168.18,3938.46)
  Bottom Layer w6.7: v1(6168.18,3938.46) 6186.75,3919.9 R168.2@6186.75,3914.4
DISP_T: C114.2 J6.5 R180.2 R181.1 R182.1 U14.5 | length 1935.7
  Top Layer w6.7: R182.1@4727.72,4183.18 4749.07,4183.18 4908.34,4023.9 4908.34,3975.92 4980.06,3904.2 5190.94,3904.2 5213.79,3881.35 5319.43,3881.35 5454.98,3745.8 5519.01,3745.8 5530.06,3756.85 R181.1@5530.06,3770.65 5574.92,3770.65 5590.72,3754.84 5676.41,3754.84 v1(5702.06,3780.5) J6.5@5702.06,3810.06
  Sig2 w5.95: v1(5702.06,3780.5) 5757.66,3836.09 5881.44,3836.09 5946.59,3770.95 6113.2,3770.95 6151.04,3808.79 v1(6151.04,3831.01)
  Bottom Layer w6.7: v1(6151.04,3831.01) 6148.69,3828.66 6148.69,3784.92 6154.47,3779.14 R180.2@6165.19,3779.14 ; C114.2@6164.56,3747.34 6164.56,3778.51 R180.2@6165.19,3779.14 ; U14.5@6209.55,3797.8 6196.48,3797.8 6177.82,3779.14 R180.2@6165.19,3779.14